# EAGLE board Smart Parking System (EAGLE 9.7.0)

Size 227.38 x 273.89 mm. Coordinates in mm from the lower left corner, seen from the top.
Outline: 0,0 227.38,0 227.38,273.89 0,273.89 0,0
Copper layers (1*16): Top 0.035mm / dielectric 1.5mm / Bottom 0.035mm
Design rules "default": minimum track width 6mil, minimum drill 0.35mm, track to track 6mil, track to pad 6mil, pad to pad 6mil, via to via 6mil, smd to smd 6mil, copper to edge 40mil, drill to drill 6mil, minimum pad ring 10mil, minimum via ring 8mil, stop-mask expansion 4mil, vias tented up to drill 0mil, thermal gap 10mil

## Footprints (pad centres in the part's own frame; a part is rotated, then mirrored left to right if it is on the bottom)
LEDRD254W60D565H860B = drill 0.981 pad 1.581: 1 -1.27,0; 2 1.27,0
LEDRD254W60D565H860B_G = drill 0.981 pad 1.581: 1 -1.27,0; 2 1.27,0
HC-SR04 = drill 1.016 long: 1 -3.81,0; 2 -1.27,0; 3 1.27,0; 4 3.81,0
BATTERY-GENERIC = drill 1.118 pad 3.15 octagon: + 2.54,0; - -2.54,0
PIEZO = drill 1 pad 1.6: 1 -3.5,0; 2 3.5,0
RESAD1016W63L850D250B = drill 0.83 pad 1.43: 1 -5.08,0; 2 5.08,0
SWITCH-SPDT-PTH-8.5X3.7MM = drill 1.016 pad 1.88: 1 -2.54,0; 2 0,0; 3 2.54,0
SG90 = drill 1.016 long: 1 -2.54,0; 2 0,0; 3 2.54,0
ARDUINO-UNO-R3-SHIELD = drill 1.016 pad 1.88: 3.3V 24.13,-2.54; 5V 24.13,0; A0 24.13,12.7; A1 24.13,15.24; A2 24.13,17.78; A3 24.13,20.32; A4 24.13,22.86; A5 24.13,25.4; AREF -24.13,-13.97; D2 -24.13,20.32; D3 -24.13,17.78; D4 -24.13,15.24; D5 -24.13,12.7; D6 -24.13,10.16; D7 -24.13,7.62; D8 -24.13,3.81; D9 -24.13,1.27; D10 -24.13,-1.27; D11 -24.13,-3.81; D12 -24.13,-6.35; D13 -24.13,-8.89; GND@0 24.13,2.54; GND@1 24.13,5.08; GND@2 -24.13,-11.43; IOREF 24.13,-7.62; NC 24.13,-10.16; RES 24.13,-5.08; RX -24.13,25.4; SCL -24.13,-19.05; SDA -24.13,-16.51; TX -24.13,22.86; VIN 24.13,7.62
LCD-I2C = drill 1.016 long: 1 -19.05,-5.08; 2 -19.05,-7.62; 3 -19.05,-10.16; 4 -19.05,-12.7

## Placement (x,y rotation side)
D1  RED  [LEDRD254W60D565H860B]  218.96,97.9 90 top
D2  RED  [LEDRD254W60D565H860B]  218.81,29.46 90 top
D3  RED  [LEDRD254W60D565H860B]  218.99,54.02 90 top
D4  RED  [LEDRD254W60D565H860B]  219.47,75.47 90 top
D5  GREEN  [LEDRD254W60D565H860B_G]  218.66,41.85 90 top
D6  GREEN  [LEDRD254W60D565H860B_G]  218.9,64.92 90 top
D7  GREEN  [LEDRD254W60D565H860B_G]  219.43,86.27 90 top
D8  GREEN  [LEDRD254W60D565H860B_G]  218.65,16.31 90 top
DIST1  DISTANCE-SENSOR-4PINHC-SR04  [HC-SR04]  26.04,45.66 180 top
P1  BATTERYGENERIC  [BATTERY-GENERIC]  45.51,196.07 270 top
PIEZO1  PIEZO  [PIEZO]  91.5,173.2 180 top
R1  220  [RESAD1016W63L850D250B]  159.03,163.62 180 top
R2  220  [RESAD1016W63L850D250B]  158.77,160.07 180 top
R3  220  [RESAD1016W63L850D250B]  158.01,145.89 180 top
R4  220  [RESAD1016W63L850D250B]  157.97,131.84 180 top
R5  220  [RESAD1016W63L850D250B]  158.65,167.4 180 top
R6  220  [RESAD1016W63L850D250B]  158.3,141.11 180 top
R7  220  [RESAD1016W63L850D250B]  158.62,156.14 180 top
R8  220  [RESAD1016W63L850D250B]  158.15,136.31 180 top
S1  TOGGLE  [SWITCH-SPDT-PTH-8.5X3.7MM]  151.67,266.6 180 top
S2  TOGGLE  [SWITCH-SPDT-PTH-8.5X3.7MM]  141.13,266.91 180 top
S3  TOGGLE  [SWITCH-SPDT-PTH-8.5X3.7MM]  129.41,266.72 180 top
S4  TOGGLE  [SWITCH-SPDT-PTH-8.5X3.7MM]  116.37,266.15 180 top
SERVO1  SERVOSG90  [SG90]  53.31,53.41 270 top
U1  ARDUINO-UNO-R3-SHIELD  [ARDUINO-UNO-R3-SHIELD]  108.89,218.57 270 top
U8  LCD-16X2-I2CSUNFOUNDER-IIC  [LCD-I2C]  127.81,36.63 0 top

## Library data of the parts
D1-D4 = Tinkercad; CATEGORY: Opto-Electronic; SUB-CATEGORY: LED; VALUE: LED_RED
D5-D8 = Tinkercad; CATEGORY: Opto-Electronic; SUB-CATEGORY: LED; VALUE: LED_GREEN
DIST1 P1 PIEZO1 R1-R8 S1-S4 SERVO1 U1 U8 = Tinkercad

## Nets
D1_A: D1.1 R5.1
D2_A: D2.1 R8.1
D3_A: D3.1 R3.1
D4_A: D4.1 R2.1
D5_A: D5.1 R6.1
D6_A: D6.1 R7.1
D7_A: D7.1 R1.1
D8_A: D8.1 R4.1
P1+: P1.+ U1.VIN
P1-: D1.2 D2.2 D3.2 D4.2 D5.2 D6.2 D7.2 D8.2 DIST1.4 P1.- PIEZO1.2 S1.1 S2.1 S3.1 S4.1 SERVO1.1 U1.GND@0 U1.GND@1 U1.GND@2 U8.1
U1_5V: DIST1.1 SERVO1.2 U1.5V U8.2
U1_A0: R3.2 U1.A0
U1_A1: R6.2 U1.A1
U1_A2: R8.2 U1.A2
U1_A3: R4.2 U1.A3
U1_A4: U1.A4 U8.3
U1_A5: U1.A5 U8.4
U1_D2: S1.2 U1.D2
U1_D3: S2.2 U1.D3
U1_D4: S3.2 U1.D4
U1_D5: S4.2 U1.D5
U1_D6: DIST1.2 U1.D6
U1_D7: DIST1.3 U1.D7
U1_D8: PIEZO1.1 U1.D8
U1_D9: SERVO1.3 U1.D9
U1_D10: R5.2 U1.D10
U1_D11: R1.2 U1.D11
U1_D12: R2.2 U1.D12
U1_D13: R7.2 U1.D13

## Tracks (layer width: path | path; a pad name or v marks a point on that pad's centre or on a via)
D1_A  (1 unrouted)
D2_A  (1 unrouted)
D3_A  (1 unrouted)
D4_A  (1 unrouted)
D5_A  (1 unrouted)
D6_A  (1 unrouted)
D7_A  (1 unrouted)
D8_A  (1 unrouted)
P1+  (1 unrouted)
P1-  (19 unrouted)
U1_5V  (3 unrouted)
U1_A0  (1 unrouted)
U1_A1  (1 unrouted)
U1_A2  (1 unrouted)
U1_A3  (1 unrouted)
U1_A4  (1 unrouted)
U1_A5  (1 unrouted)
U1_D2  (1 unrouted)
U1_D3  (1 unrouted)
U1_D4  (1 unrouted)
U1_D5  (1 unrouted)
U1_D6  (1 unrouted)
U1_D7  (1 unrouted)
U1_D8  (1 unrouted)
U1_D9  (1 unrouted)
U1_D10  (1 unrouted)
U1_D11  (1 unrouted)
U1_D12  (1 unrouted)
U1_D13  (1 unrouted)